# Altium PCB ST-WM8978.PCBdoc
Units mm, origin at the board's own origin, x right, y up, seen from the top; angles counter-clockwise.
Board outline 39.42 x 18.31 mm, 2 copper layers (TopLayer, BottomLayer); 38 components, 38 nets, 117 pads, 109 vias.
Unrouted connection lines stored in the file: 2.
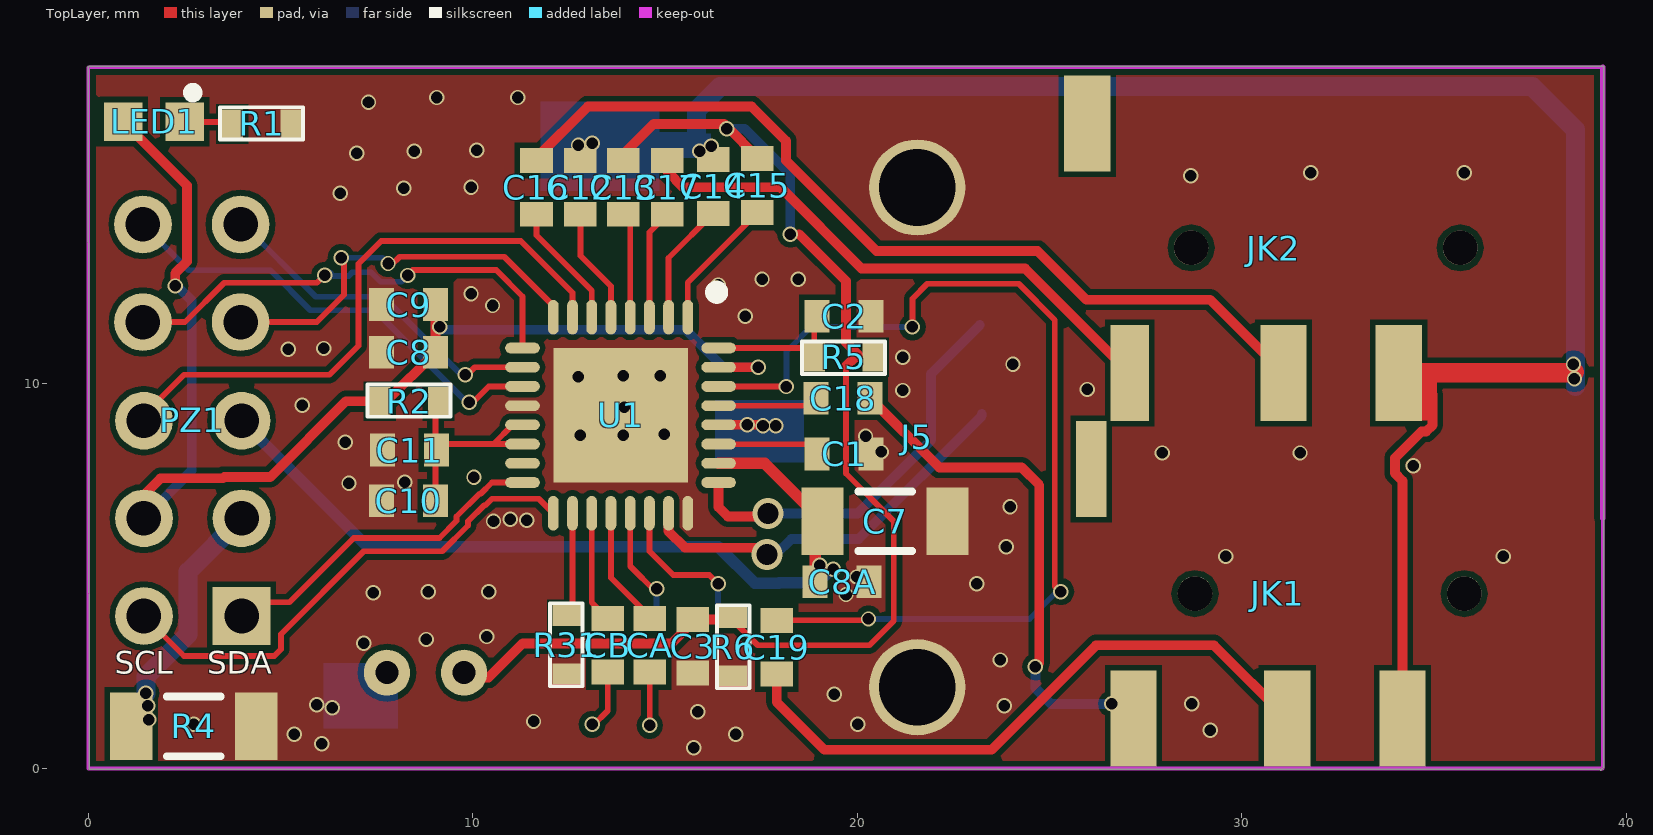
[diagram p0: TopLayer view]
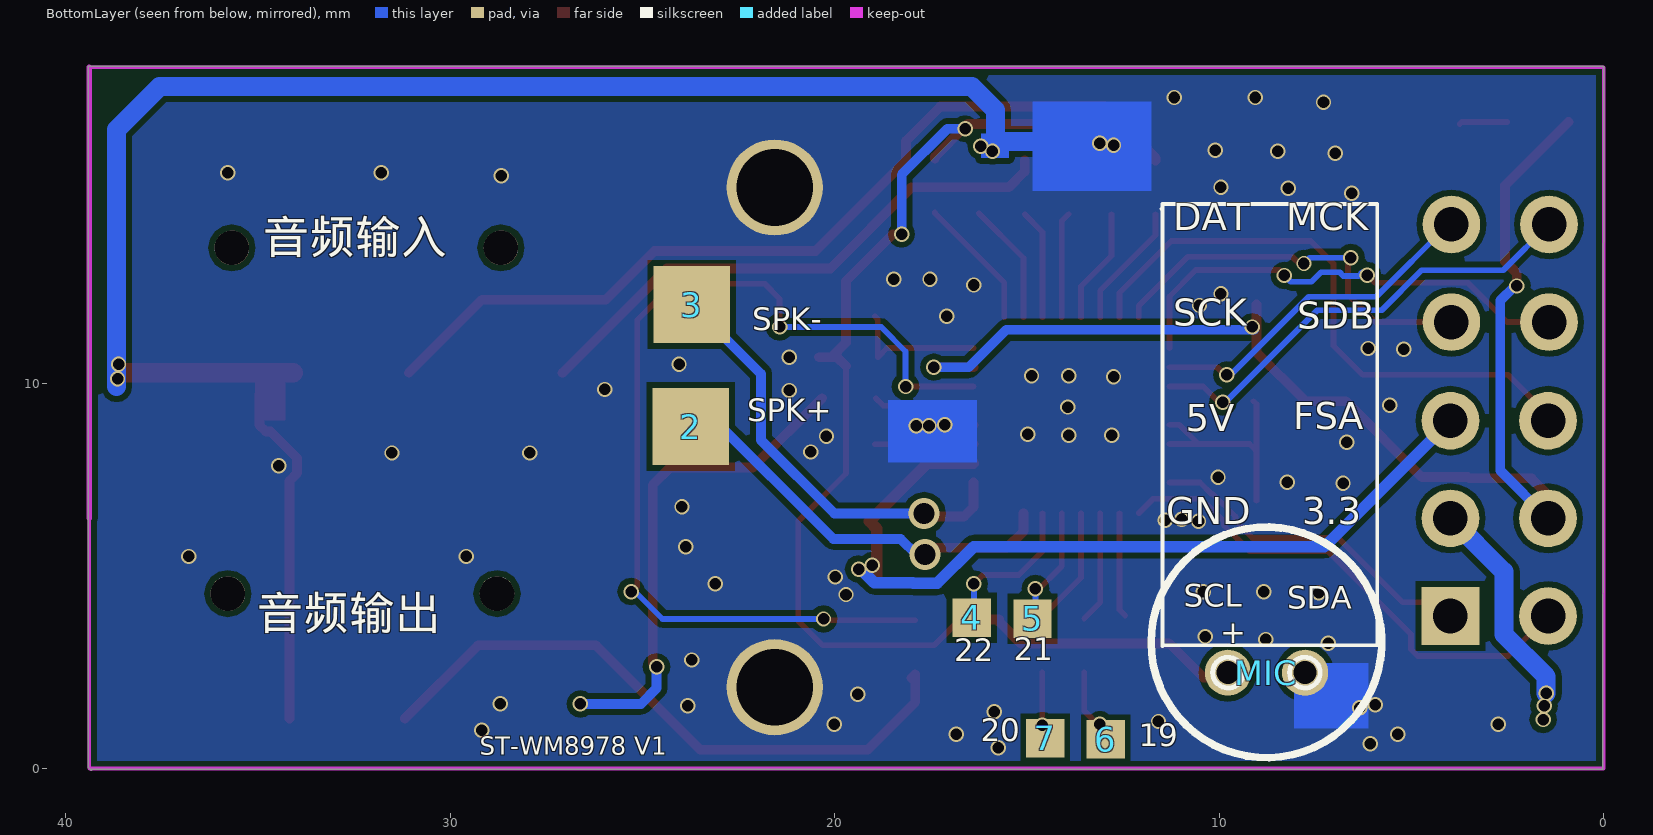
[diagram p1: BottomLayer view, seen from below]

## Layer stack, top to bottom
TopLayer: signal copper 0.0356
Dielectric: dielectric 0.32, FR-4, Dk 4.8
BottomLayer: signal copper 0.0356

## Board outline
0,18.237 0.025,18.263 39.421,18.263 39.421,0.025 39.345,-0.051 39.319,-0.025 0.025,-0.025

## Design rules (kind name [scope] priority, off if disabled: settings)
Clearance Clearance_1 [(InPoly)] p1: gap=0.15
Clearance [All] p2: gap=0.15
ComponentClearance [All] p1 off: gap=0.254 collisioncheckmode=3 verticalgap=0.254 showdistances=FALSE
FabricationTestPointUsage TestPointUsage [All] p1: valid=0 allowmultiple=FALSE
FabricationTestpoint Testpoint [All] p1: side=3 testpointundercomponent=TRUE minsize=1.016 maxsize=2.54 preferedsize=1.524 minholesize=0.508 maxholesize=1.016 preferedholesize=0.813 testpointgrid=0.025 allowsidetop=TRUE allowsidebottom=TRUE usegrid=TRUE gridtolerance=0
PlaneConnect [All] p1: planeconnectstyle=Direct reliefexpansion=0.508 reliefentries=4 reliefconductorwidth=0.254 reliefairgap=0.254
PolygonConnect [All] p1: connectstyle=Direct reliefconductorwidth=0.254 reliefentries=4 polygonreliefangle="90 Angle"
PolygonConnect PolygonConnect_1 [All] p2: connectstyle=Direct reliefconductorwidth=0.254 reliefentries=4 polygonreliefangle="90 Angle"
RoutingVias [All] p1: holewidth=0.4 width=0.6 viastyle="Through Hole" minholewidth=0.1 minwidth=0.1 maxholewidth=0.711 maxwidth=1.27
SilkscreenOverComponentPads [IsPad] p1: minsilkscreentomaskgap=0.254
SolderMaskExpansion [All] p1: expansion=0.102
Width [All] p1: maxlimit=222 minlimit=0.1 preferedwidth=0.25
23 further rules are at their usual default settings.

## Components (designator, comment, footprint, x,y, rotation, side; value= is the part's Value field where it differs from the comment)
2 "pad2" SPK 23.647,9.068 r90 top
3 "pad2" SPK 23.622,12.243 r90 top
4 "pad2" PAD-1 16.434,3.912 r90 top
5 "pad2" PAD-1 14.859,3.886 r90 top
6 "pad2" PAD-1 12.954,0.762 r90 top
7 "pad2" PAD-1 14.529,0.787 r90 top
C1 "106" C0603 19.685,8.204 r0 top
C2 "106" C0603 19.685,11.786 r0 top
C3 "220P" C0603 15.748,3.15 r270 top
C7 "106" FUSE3216X08M 20.726,6.426 r180 top
C8 "104" C0603 8.306,10.795 r180 top
C8A "104" C0603 19.583,4.826 r180 top
C9 "106" C0603 8.306,12.04 r180 top
C10 "106" C0603 8.306,6.934 r180 top
C11 "104" C0603 8.331,8.255 r180 top
C12 "105" C0603 12.776,15.138 r90 top
C13 "105" C0603 13.894,15.138 r90 top
C14 "105" C0603 16.231,15.164 r90 top
C15 "105" C0603 17.374,15.189 r90 top
C16 "105" C0603 11.633,15.138 r90 top
C17 "105" C0603 15.037,15.138 r90 top
C18 "106" C0603 19.66,9.652 r0 top
C19 "106" C0603 17.932,3.124 r270 top
CA "104" C0603 14.63,3.175 r270 top
CB "104" C0603 13.538,3.175 r270 top
J5 "2pcs铜柱" PAD-2MM 21.844,8.611 r90 top locked
JK1 "6P" CKX-3.5-320#1 35.789,4.547 r90 top
JK2 "6P" CKX-3.5-320#2 35.687,13.538 r90 top locked
LED1 "BLUE" LED0603 0.914,16.815 r180 top
MIC "麦克风" MIC1 7.185,1.168 r0 bottom
PZ1 "10P" 10P2.54 5.283,14.935 r90 top locked
R1 "1K" R0603 4.318,16.688 r180 top
R2 "10R" R0603 8.153,9.474 r180 top
R4 "1A" FUSE3216X08M 2.743,1.092 r0 top
R5 "680" R0603 19.837,10.77 r0 top
R6 "47K" R0603 16.688,3.353 r90 top
R31 "10K" R0603 12.522,3.023 r270 top
U1 "STM32F100CBT6B" QFN-32_5X5X05P 15.596,11.735 r180 top

## Footprints (in the part's own frame and the unit in brackets; to place one, negate y for a bottom-side part, rotate by r counter-clockwise, add the part's x,y. Pads: shape width x height; smd on the part's side, far side on the other; paste and mask are expansions set on the pad)
10P2.54 [mm]
  rect 1.5x1.5 hole 0.9: 1(-10.973,1.295)
  round 1.5 hole 0.9: 2(-10.973,3.835) 3(-8.433,1.295) 4(-8.433,3.835) 5(-5.893,1.295) 6(-5.893,3.835) 7(-3.327,1.321) 8(-3.327,3.861) 9(-0.787,1.321) 10(-0.787,3.861)
C0603 [mm]
  rect 0.65x0.85 smd: 1(-0.725,-0.025) 2(0.675,-0.025)
  body extent -0.83,-0.43 0.77,0.37, height 0.45
CKX-3.5-320#1 [mm]
  round 0.9 hole 0.9: 0(0,7) 0(0,0)
  rect 2.5x1.2 smd: 1(-3.25,1.6) 2(-3.25,4.6) 3(-3.25,8.6)
  rect 2.5x0.8 smd: 4(3.24,9.7)
  body extent -3.05,-3.63 3.05,10.54, height 6
CKX-3.5-320#2 [mm]
  round 0.9 hole 0.9: 0(0,7) 0(0,0)
  rect 2.5x1.2 smd: 1(-3.25,1.6) 2(-3.25,4.6) 4(3.24,9.7)
  rect 2.5x1 smd: 3(-3.25,8.6)
  body extent -3.05,-3.63 3.05,10.54, height 6
FUSE3216X08M [mm] "Chip Fuse, 2-Leads, Body 3.20x1.60mm, IPC Low Density"
  rect 1.1x1.75 smd: 1(-1.625,0) 2(1.625,0)
  silkscreen extent -0.7,-0.77 0.7,0.77, body extent -1.62,-0.82 1.63,0.83, height 0.8
LED0603 [mm]
  rect 1x1 smd: 1(0,0) 2(-1.6,0)
  body extent -1.69,-0.45 0.01,0.45, height 0.9
MIC1 [mm]
  round 1.2 hole 0.6: 1(0.584,-1.321) 2(2.591,-1.321)
  silkscreen extent -1.41,-5.11 4.59,0.89
PAD-1 [mm]
  rect 1x1 smd far side: 1(0,0)
PAD-2MM [mm]
  round 2.5 hole 2: 1(-6.5,0.279) 2(6.5,0.279)
  body extent 12.42,-4.73 15.03,45.89, height 8.54
QFN-32_5X5X05P [mm]
  oval 0.28x0.9 smd: 1(0,0) 2(0.5,0) 3(1,0) 4(1.5,0) 5(2,0) 6(2.5,0) 7(3,0) 8(3.5,0) 17(3.5,5.1) 18(3,5.1) 19(2.5,5.1) 20(2,5.1) 21(1.5,5.1) 22(1,5.1) 23(0.5,5.1) 24(0,5.1)
  oval 0.9x0.28 smd: 9(4.3,0.8) 10(4.3,1.3) 11(4.3,1.8) 12(4.3,2.3) 13(4.3,2.8) 14(4.3,3.3) 15(4.3,3.8) 16(4.3,4.3) 25(-0.8,4.3) 26(-0.8,3.8) 27(-0.8,3.3) 28(-0.8,2.8) 29(-0.8,2.3) 30(-0.8,1.8) 31(-0.8,1.3) 32(-0.8,0.8)
  rect 3.5x3.5 smd: 33(1.75,2.55)
  silkscreen extent -0.9,-0.8 -0.6,-0.5, body extent -0.95,-0.15 4.45,5.08, height 1
R0603 [mm]
  rect 0.55x0.75 smd: 1(-0.954,-0.076) 2(0.573,-0.076)
  silkscreen extent -1.27,-0.51 0.89,0.33, body extent -0.98,-0.48 0.62,0.32, height 0.5
SPK [mm]
  rect 2x2 smd far side: 1(-0.178,-0.102)

## Part data
C1 C2 C3 C7 C8 C8A C9 C10 C11 C12 C13 C14 C15 C16 C17 C18 C19 CA CB: library part CAP, "Capacitor"
J5 MIC: library part PAD1
JK1 JK2: library part CON13
LED1: library part LED1
PZ1: library part CON30
R1 R2 R4 R5 R6 R31: library part RES_4
U1: library part WM8978

## Via types
v1: diameter 0.4, hole 0.3, TopLayer to BottomLayer, tented both sides, 102 vias
v2: diameter 0.4, hole 0.3, TopLayer to BottomLayer, 5 vias
v3: diameter 0.8, hole 0.55, TopLayer to BottomLayer, tented both sides, 2 vias

## Nets (pads, with @x,y where several pads share a name; then routed paths per layer and width w, separated by ;. In a path a pad name is that pad's centre, name@x,y a point inside that pad or via, vN(x,y) a via of type N, cw(c..) or ccw(c..) an arc to the next point about the centre after c; other vN are vias at no path point)
3.3V: C8.1 C9.1 LED1.1 PZ1.4 R2.2 U1.31 | length 32.5
  TopLayer w0.254: LED1.1 2.565,15.164 2.565,13.183 2.261,12.878 v1(2.261,12.548) ; PZ1.4 1.448,7.112 1.88,7.544 3.506,7.544 3.542,7.579 4.735,7.579 6.706,9.55 R2.2 7.761,9.55 C8.1 C9.1 ; U1.31 v1(17.424,10.435)
  BottomLayer w0.254: PZ1.4 2.692,7.747 2.692,12.167 v1@2.337,12.522 ; v1@9.098,11.409 15.54,11.409 16.515,10.435 v1(17.424,10.435)
  other v1: 9.144,11.481
5V: C7.2 C8A.2 PZ1.5 U1.26 | length 22.2
  TopLayer w0.3: U1.26 17.593,7.935 C7.2 18.909,6.234 C8A.2
  BottomLayer w0.3: PZ1.5 7.264,5.766 16.389,5.766 17.342,4.813 17.964,4.813 17.977,4.826 18.974,4.826 v1@19.304,5.156
  other v1: 19.38,5.182 19.025,5.283
AGND: C12.2 C14.2 JK2.1 MIC.1 U1.28 | length 39.5
  TopLayer w0.254: U1.28 17.469,8.935 v1@17.501,8.966
  TopLayer w0.5: JK2.1 38.635,10.288 v1@38.659,10.312
  BottomLayer w0.5: v1@13.056,16.307 15.672,16.307 15.824,16.459 15.824,17.12 16.442,17.737 37.559,17.737 38.684,16.612 38.684,9.931
  other v1: 17.551,8.915 17.145,8.941 38.659,10.135 38.633,10.516 15.9,16.053 16.205,16.18 12.751,16.205 13.106,16.256
  other v2: 17.882,8.915
AUXL: 6.1 CB.2 | length 1.5
  TopLayer w0.15: v1@13.132,1.118 13.513,1.499 CB.2
  other v1: 13.106,1.143
AUXR: 7.1 CA.2 | length 1.5
  TopLayer w0.15: CA.2 14.605,1.194 v1@14.707,1.092
  other v1: 14.605,1.118
DAT: PZ1.9 U1.10 | length 9
  TopLayer w0.15: v1@9.83,10.211 10.054,10.435 U1.10
  BottomLayer w0.15: PZ1.9 4.039,14.148 5.918,12.268 7.671,12.268 9.703,10.236 v1(9.804,10.236)
FSA: PZ1.6 U1.7 | length 15.6
  TopLayer w0.15: PZ1.6@1.448,9.195 2.489,10.236 6.274,10.236 7.031,10.994 7.031,13.127 7.62,13.716 11.252,13.716 12.596,12.373 U1.7
  TopLayer w0.254: PZ1.6 PZ1.6@1.448,9.195
GND: C1.2 C2.2 C3.2 C7.1 C8.2 C8A.1 C9.2 C10.2 C11.2 J5.1 J5.2 R1.1 R4.2 R6.1 R31.2 U1.12 U1.24 U1.33
  other v1: 15.748,0.533 6.071,0.635 5.359,0.889 16.84,0.889 29.185,0.991 2.743,1.143 20.015,1.143 11.582,1.219 15.85,1.473 6.35,1.575 23.825,1.626 5.944,1.651 28.702,1.676 19.406,1.93 23.724,2.819 7.163,3.251 8.788,3.353 10.363,3.429 7.417,4.572 8.839,4.597 10.414,4.597 23.114,4.801 29.591,5.512 36.805,5.512 23.876,5.766 10.541,6.426 11.405,6.452 10.973,6.477 23.978,6.807 6.782,7.417 8.23,7.442 10.033,7.569 34.468,7.874 27.94,8.204 31.521,8.204 20.625,8.23 6.68,8.484 20.218,8.636 12.802,8.661 13.919,8.661 14.986,8.687 13.945,9.398 5.563,9.449 21.184,9.83 25.984,9.855 12.751,10.185 13.919,10.211 14.884,10.211 24.054,10.516 21.184,10.693 5.207,10.897 6.121,10.922 17.094,11.76 10.516,12.04 9.957,12.344 16.383,12.573 17.526,12.725 18.466,12.725 6.553,14.961 8.204,15.088 9.957,15.113 28.677,15.418 31.801,15.494 35.789,15.494 6.985,16.002 8.484,16.053 10.109,16.078 7.29,17.323 9.068,17.45 11.176,17.45
  other v2: 19.71,4.521 19.99,4.978
MCLK: PZ1.10 U1.11 | length 11.9
  TopLayer w0.15: v1@9.982,9.5 10.417,9.935 U1.11
  BottomLayer w0.15: PZ1.10 2.616,12.954 4.737,12.954 5.773,11.918 7.451,11.918 9.844,9.525 v1(9.906,9.525)
Net4_1: 4.1 U1.22 | length 4
  TopLayer w0.15: U1.22 14.596,5.648 15.215,5.029 16.154,5.029 v1@16.358,4.826
  BottomLayer w0.15: v1(16.383,4.801) 16.383,3.962 4.1
Net5_1: 5.1 U1.21 | length 3.1
  TopLayer w0.15: U1.21 14.096,5.259 v1@14.757,4.597
  BottomLayer w0.15: v1(14.783,4.674) 14.783,3.962 5.1
NetC1_1: C1.1 U1.27 | length 2.6
  TopLayer w0.15: U1.27@16.398,8.433 C1.1@18.96,8.433
  TopLayer w0.254: U1.27 U1.27@16.398,8.433
NetC2_1: C2.1 R5.1 U1.32 | length 3.7
  TopLayer w0.15: U1.32 18.642,10.935 R5.1 18.883,11.684 C2.1
NetC3_1: C3.1 C13.2 C15.2 MIC.2 R5.2 R6.2 | length 32.2
  TopLayer w0.15: R6.2 16.764,3.854 17.417,3.2 20.32,3.2 20.955,3.835 20.955,6.426 19.71,7.671 19.71,10.465
  TopLayer w0.254: MIC.2@9.779,2.337 9.804,2.362 10.414,2.362 11.3,3.248 15.165,3.248 15.723,3.806 C3.1 16.713,3.875 R6.2 ; C13.2 13.919,15.977 14.707,16.764 v1@16.543,16.764 ; v1@16.641,16.666 17.399,15.908 C15.2 ; 18.491,13.894 19.708,12.677 19.708,11.077 20.091,10.693 ; 19.71,10.465 19.939,10.693 20.091,10.693 ; R5.2 20.091,10.693
  BottomLayer w0.254: v1(16.612,16.637) 17.069,16.637 18.263,15.443 v1(18.263,13.894)
NetC10_1: C10.1 C11.1 R2.1 U1.13 U1.14 | length 5.9
  TopLayer w0.15: C10.1 9.031,9.474 R2.1 ; C11.1 9.211,8.435 10.541,8.435 ; U1.14 10.541,8.435 ; U1.13 11.041,8.935 10.541,8.435
NetC12_1: C12.1 U1.5 | length 3
  TopLayer w0.15: C12.1 12.802,13.335 13.596,12.541 U1.5
NetC13_1: C13.1 U1.4 | length 2.8
  TopLayer w0.15: C13.1 14.096,14.237 U1.4
NetC14_1: C14.1 U1.2 | length 3.2
  TopLayer w0.15: U1.2 15.096,13.278 C14.1
NetC15_1: C15.1 U1.1 | length 3.5
  TopLayer w0.15: U1.1 15.596,12.639 17.399,14.442 C15.1
NetC16_1: C16.1 U1.6 | length 3.3
  TopLayer w0.15: C16.1 11.659,13.868 13.096,12.431 U1.6
NetC16_2: C16.2 JK2.2 | length 23.2
  TopLayer w0.254: C16.2 11.659,15.882 12.994,17.218 17.257,17.218 18.151,16.324 18.151,15.809 20.501,13.459 24.692,13.459 25.959,12.192 29.183,12.192 JK2.2
NetC17_1: C17.1 U1.3 | length 2.9
  TopLayer w0.15: U1.3 14.596,13.946 C17.1
NetC17_2: C17.2 JK2.3 | length 14.5
  TopLayer w0.254: C17.2 15.062,15.519 15.466,15.116 18.006,15.116 20.117,13.005 24.37,13.005 JK2.3
NetC18_1: C18.1 U1.29 | length 2.6
  TopLayer w0.15: U1.29 18.742,9.435 C18.1
NetC18_2: C18.2 JK1.3 | length 12.8
  TopLayer w0.254: C18.2 22.138,7.823 24.282,7.823 24.74,7.366 24.74,2.743 v1(24.638,2.642)
  BottomLayer w0.254: v1(24.638,2.642) 24.638,2.083 25.044,1.676 v1(26.619,1.676)
NetC19_1: C19.1 U1.30 | length 25.9
  TopLayer w0.15: U1.30 v1@18.161,9.935 ; C19.1 20.382,3.85 v1@20.396,3.835 ; v1(21.438,11.481) 21.438,12.217 21.823,12.603 24.204,12.603 25.142,11.665 25.142,4.729
  BottomLayer w0.15: v1(18.161,9.931) 18.161,10.846 18.796,11.481 v1(21.438,11.481) ; v1(20.295,3.886) 24.486,3.886 25.197,4.597 v1(25.298,4.597)
NetC19_2: C19.2 JK1.2 | length 16.6
  TopLayer w0.254: C19.2@18.009,2.348 C19.2 17.907,1.727 19.152,0.483 23.495,0.483 26.213,3.2 29.285,3.2 JK1.2
NetCA_1: CA.1 U1.20 | length 3.2
  TopLayer w0.15: U1.20 13.596,4.957 14.605,3.947 CA.1
NetCB_1: CB.1 U1.19 | length 2.9
  TopLayer w0.15: U1.19 13.096,4.317 CB.1
NetLED1_2: LED1.2 R1.2 | length 1.3
  TopLayer w0.15: LED1.2 3.694,16.815 R1.2
NetPZ1_3: PZ1.3 R4.1 | length 5.6
  BottomLayer w0.5: v1(1.499,1.956) 1.499,2.387 2.598,3.486 2.598,5.112 PZ1.3
  other v2: 1.575,1.27 1.549,1.626
NetR31_1: R31.1 U1.18 | length 2.7
  TopLayer w0.15: R31.1 12.596,4.126 U1.18
SCK: PZ1.7 U1.8 | length 10.2
  TopLayer w0.15: PZ1.7 5.944,11.608 6.655,12.319 v1@6.655,13.132 ; v1@7.899,13.106 8.103,13.31 10.82,13.31 12.096,12.034 U1.8
  BottomLayer w0.15: v1(6.579,13.284) 7.645,13.284 v1(7.798,13.132)
SCL: PZ1.1 U1.16 | length 8.8
  TopLayer w0.15: PZ1.1 4.343,4.318 5.232,4.318 6.909,5.994 9.134,5.994 9.581,6.441 9.581,6.551 10.174,7.144 10.209,7.144 10.5,7.435 U1.16
SDA: PZ1.2 U1.17 | length 13.2
  TopLayer w0.15: PZ1.2 2.489,2.921 4.835,2.921 5.013,3.098 5.013,3.489 7.168,5.644 9.208,5.644 9.881,6.317 9.881,6.427 10.299,6.844 10.333,6.844 10.5,7.01 11.72,7.01 U1.17
SDB: PZ1.8 U1.9 | length 12.2
  TopLayer w0.15: PZ1.8 2.513,11.608 3.538,12.633 5.953,12.633 v1(6.147,12.827) ; v1@8.438,12.96 10.612,12.96 11.296,12.276 U1.9
  BottomLayer w0.15: v1@6.096,12.802 6.198,12.903 6.288,12.903 6.382,12.809 6.775,12.809 6.869,12.903 7.355,12.903 7.601,12.657 8.141,12.657 v1(8.306,12.821)
SPK+: 2.1 U1.23 | length 10.3
  TopLayer w0.254: U1.23 15.096,6.164 15.519,5.74 v3@17.653,5.74
  BottomLayer w0.254: v3(17.653,5.563) 17.882,5.563 18.288,5.969 20.041,5.969 23.241,9.169 2.1@23.241,9.22
SPK_: 3.1 U1.25 | length 10.6
  TopLayer w0.254: U1.25 16.396,6.795 16.637,6.553 v3@17.704,6.553
  BottomLayer w0.254: v3(17.678,6.629) 20.015,6.629 21.92,8.534 21.92,10.262 3.1@23.19,11.532
pads on no net: JK1.0 JK1.1 JK1.4 JK2.0 JK2.4 U1.15
copper on no net: | length 9
  TopLayer w0.254: 34.189,1.297 34.189,7.479 33.991,7.676 33.991,8.072 34.68,8.761 34.802,8.761 34.964,8.923 34.964,9.728

## Polygon pours and split planes (outlines as drawn)
GND on TopLayer "BottomOverlay-No Net" (solid, remove dead copper, pour order 1000): -0.076,0.051 39.345,0.051 39.37,0.025 39.395,0.051 39.395,18.263 0,18.263 -0.025,18.237
GND on BottomLayer "BottomOverlay-No Net" (solid, remove dead copper, pour order 1001): -0.025,0.051 0.025,0 39.421,0 39.421,18.136 39.395,18.161 39.319,18.237 -0.025,18.237

## Keep-outs
KeepOutLayer:
  lines w0.1: 0,0 0,18.237 39.395,18.237 ; 0.025,0 39.395,0 39.395,6.579
  lines w0.15: 39.395,6.502 39.395,18.237

## Other copper
TopLayer:
  rectangle net AGND: 34.29,9.042 35.077,10.135
BottomLayer:
  rectangle net AGND: 12.09,15.57 14.427,16.942
  rectangle net GND: 16.307,7.95 18.618,9.576
  rectangle net GND: 6.121,1.041 8.052,2.743
  rectangle net AGND: 15.469,15.875 16.205,16.51
  rectangle: 6.553,1.245 7.696,2.413
  rectangle: 16.713,8.331 18.161,9.347
  rectangle: 11.76,15.011 14.859,17.348

## Silkscreen, mask and mechanical layers (free items; w line width, h text height)
TopOverlay:
  circle w0.254: c2.718,17.577 r0.127
  text "SCL" at 0.686,2.261 h1
  text "SDA" at 3.099,2.261 h1
BottomOverlay:
  lines w0.1: 11.506,14.554 11.481,14.529 ; 11.481,14.529 11.481,14.681 5.893,14.681 5.893,3.2 11.455,3.2 11.481,3.175 11.481,14.529
  text "MCK" at 8.255,13.767 h1.2
  text "DAT" at 11.201,13.767 h1.2
  text "音频输入" at 34.874,13.106 h1.5
  text "SCK" at 11.201,11.278 h1.2
  text "SDB" at 7.976,11.201 h1.2
  text "SPK-" at 22.149,11.201 h1
  text "SPK+" at 22.276,8.839 h1
  text "FSA" at 8.077,8.585 h1.2
  text "5V" at 10.871,8.534 h1.2
  text "3.3" at 7.849,6.121 h1.2
  text "GND" at 11.379,6.121 h1.2
  text "SCL" at 10.922,4.013 h1
  text "SDA" at 8.23,3.962 h1
  text "音频输出" at 35.027,3.327 h1.5
  text "21" at 15.342,2.616 h1
  text "22" at 16.891,2.591 h1
  text "20" at 16.205,0.508 h1
  text "19" at 12.09,0.381 h1
  text "ST-WM8978 V1" at 29.235,0.203 h0.8

## Text inside footprints (layer, text, board x,y; h text height)
MIC: BottomOverlay "+" at 9.979,3.962 h1 r180